# Altium PCB PCB1.PcbDoc
Units mm, origin at the board's own origin, x right, y up, seen from the top; angles counter-clockwise.
Board outline 55.5 x 82.55 mm, 2 copper layers (Top Layer, Bottom Layer); 50 components, 54 nets, 240 pads, 65 vias.
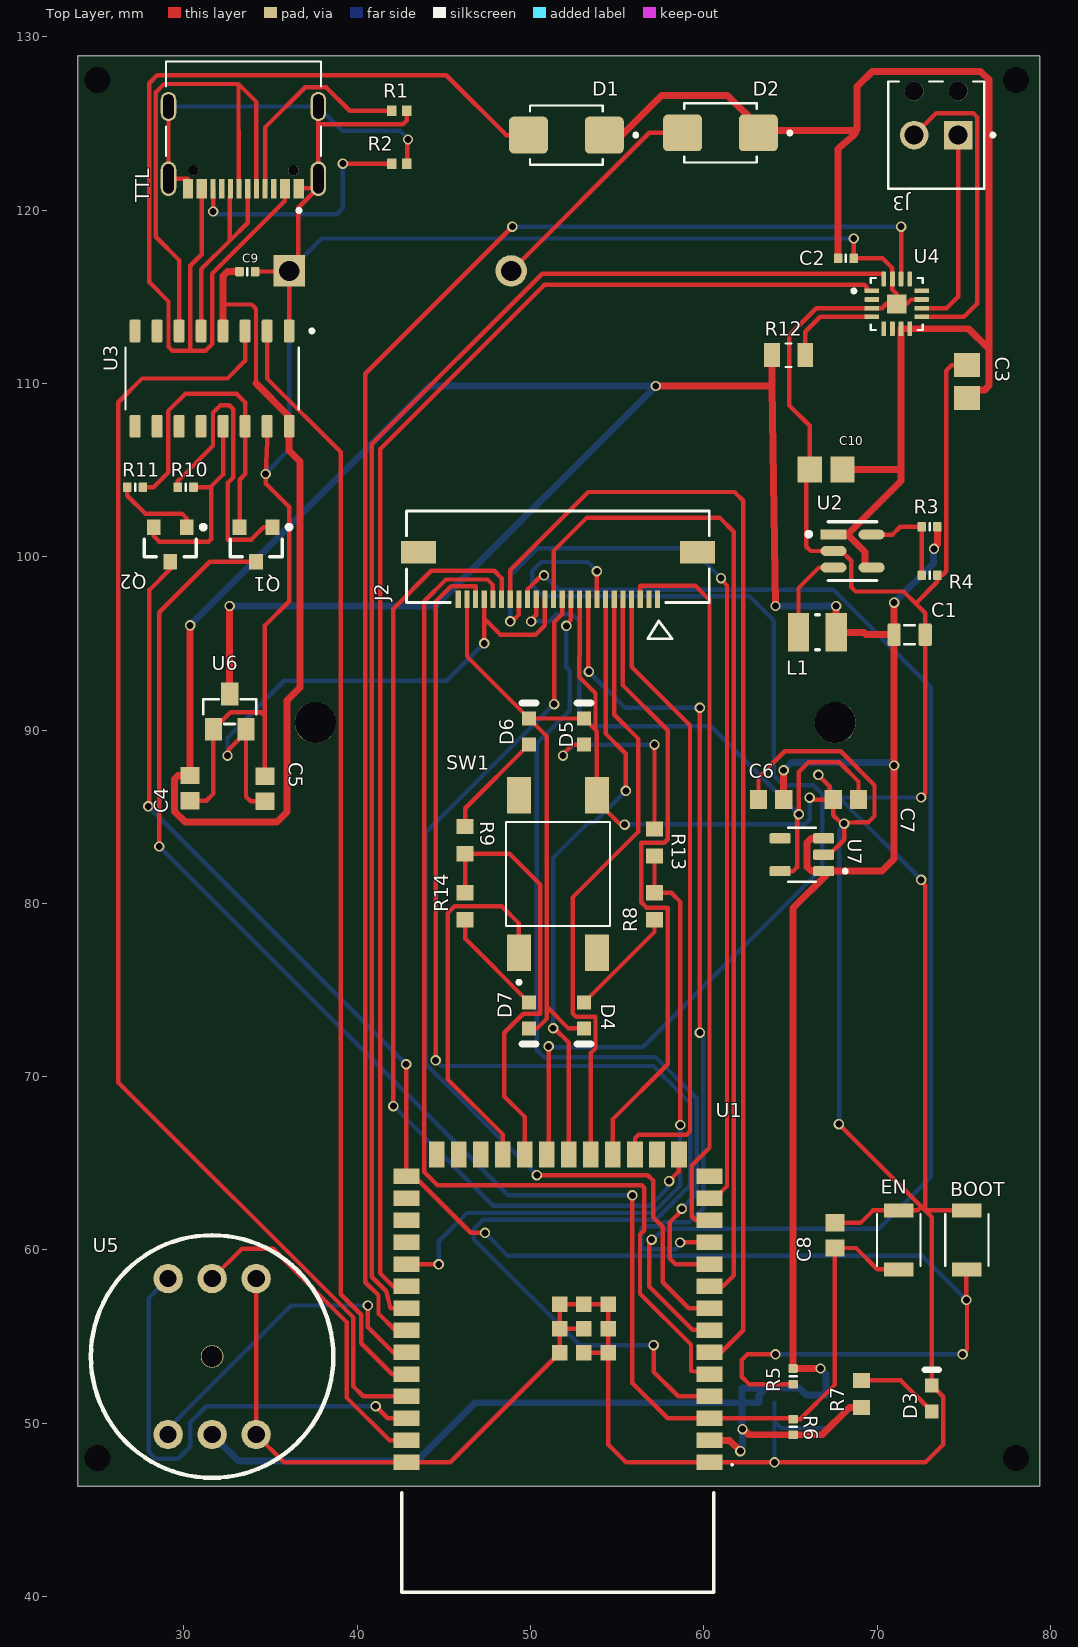
[diagram p0: Top Layer view]
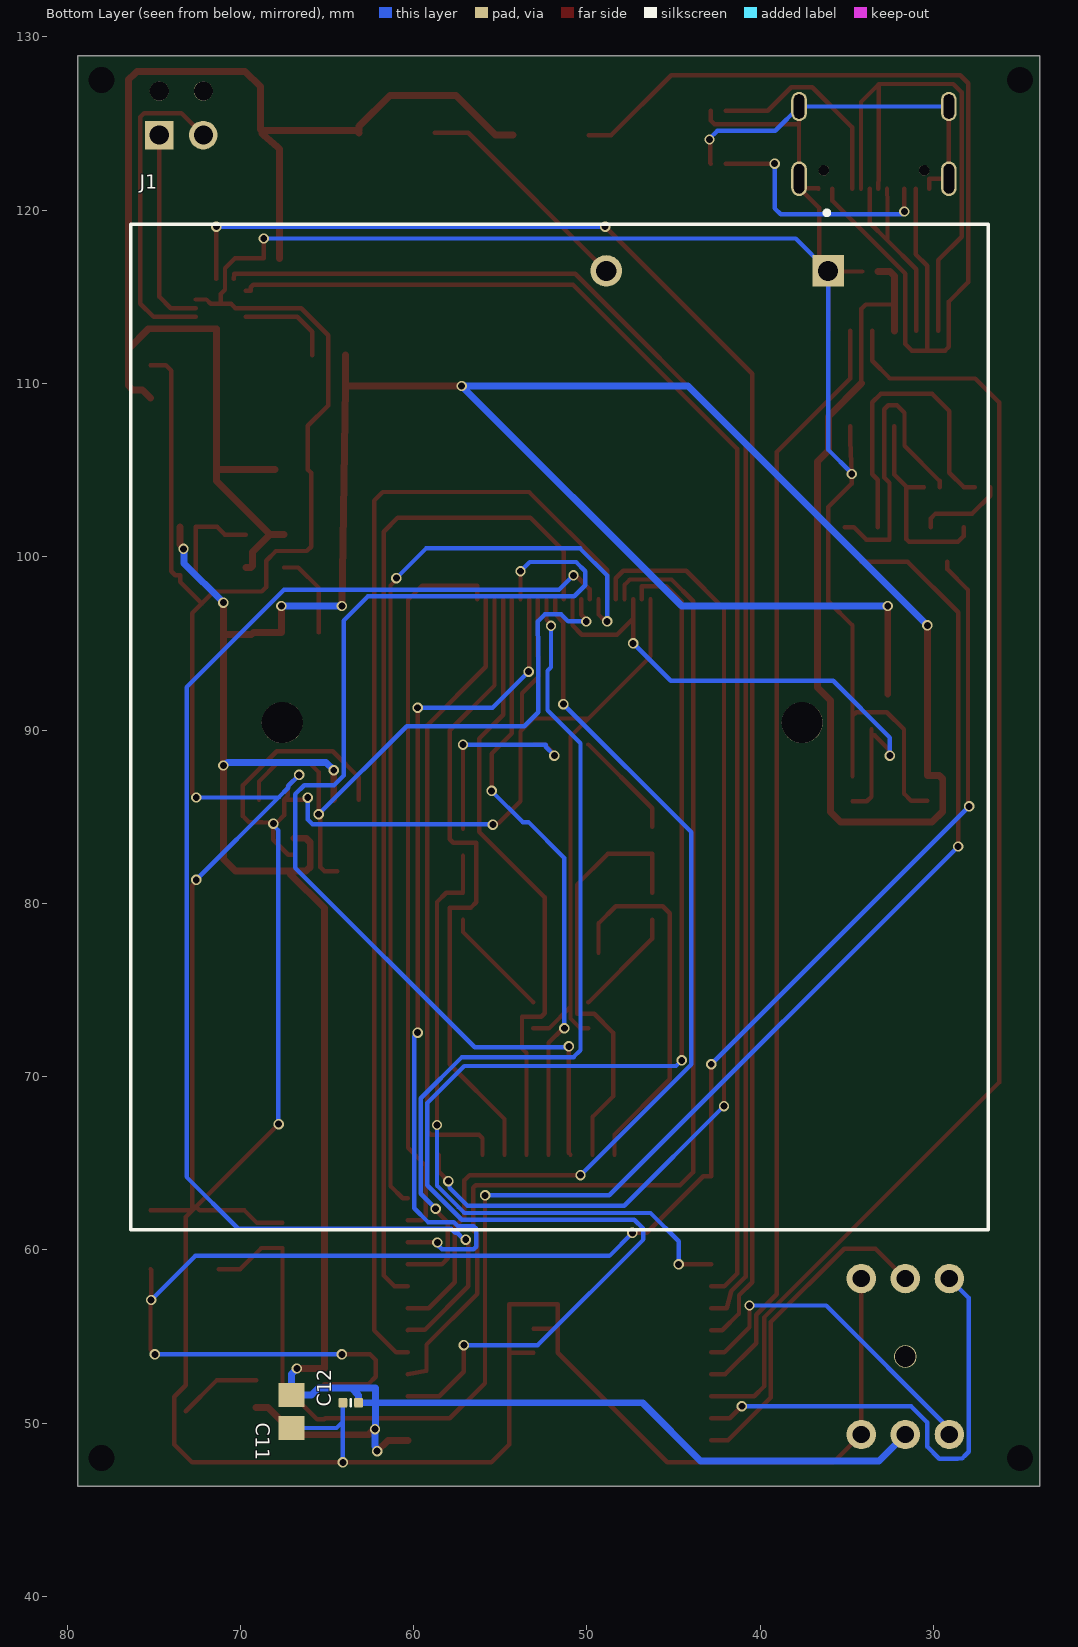
[diagram p1: Bottom Layer view, seen from below]
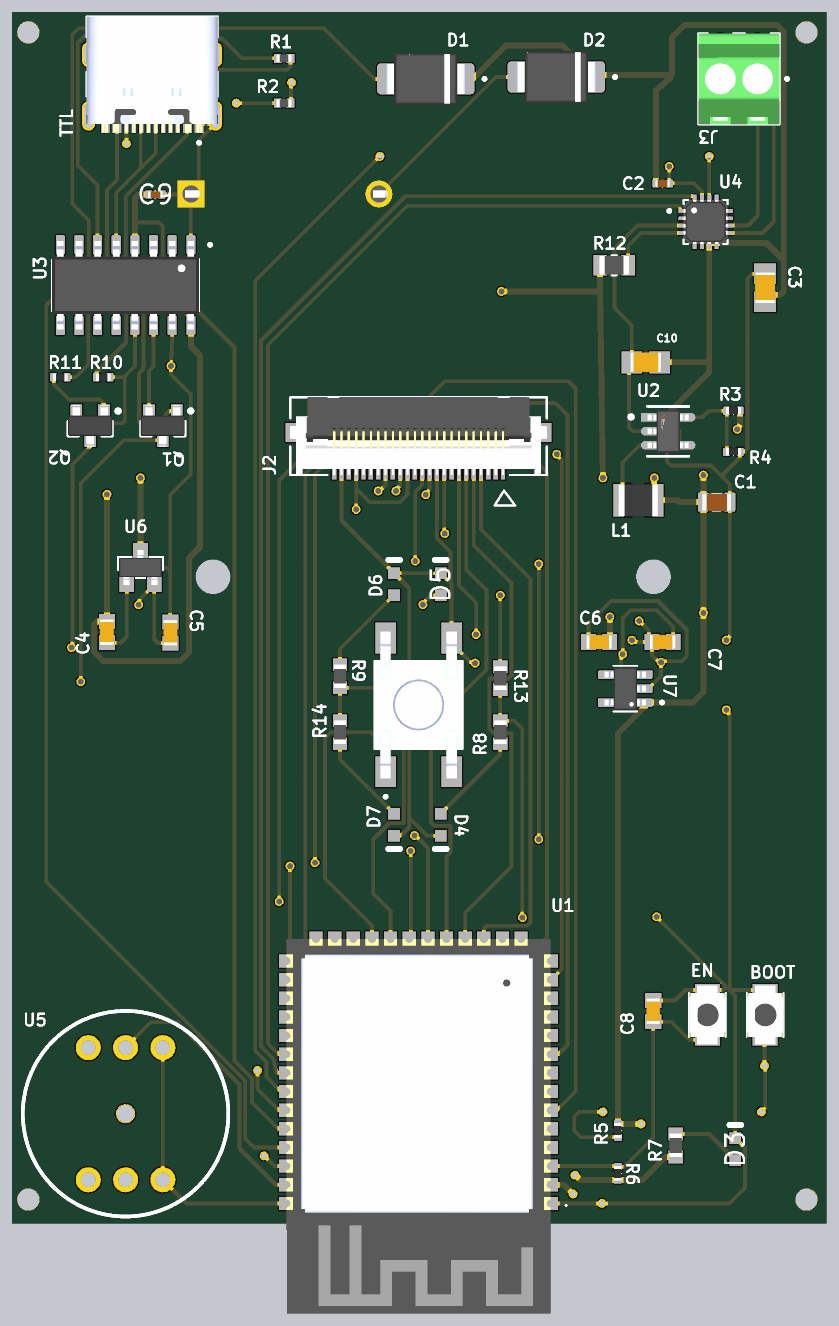
[diagram p2: 3D render of the assembled board from above, using the file's embedded part models]
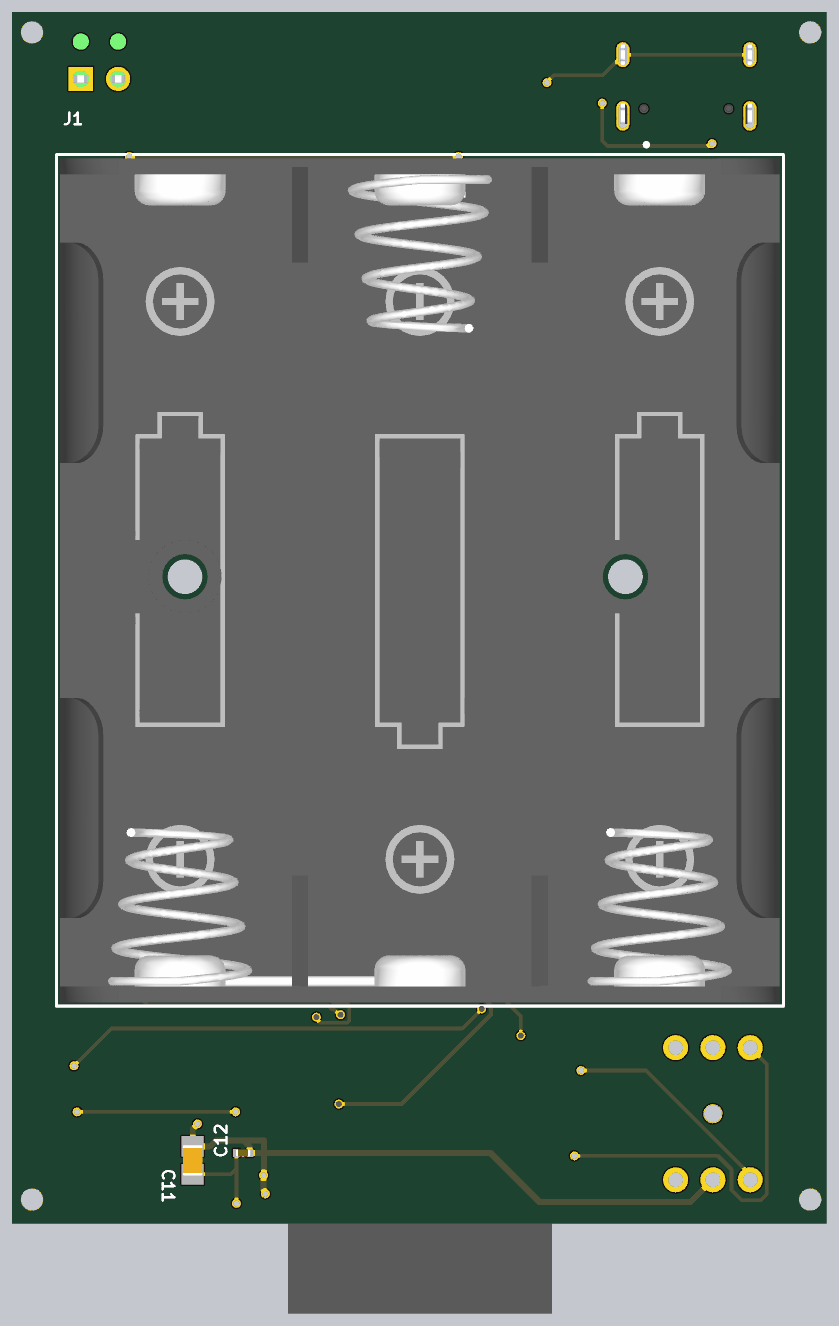
[diagram p3: 3D render of the assembled board from below, using the file's embedded part models]

## Layer stack, top to bottom
Top Solder: solder mask 0.0254, SM-002, Dk 4
Top Layer: signal copper 0.0356
Dielectric 1: dielectric 0.32, FR-4, Dk 4.8
Bottom Layer: signal copper 0.0356
Bottom Solder: solder mask 0.0254, SM-002, Dk 4

## Board outline
23.876,46.355 79.375,46.355 79.375,46.482 79.375,46.736 79.375,128.905 24.13,128.905 23.876,128.905

## Design rules (kind name [scope] priority, off if disabled: settings)
Clearance Clearance_smallQFNs [All] p1: gap=0.127 ignorepadtopadclearanceinfootprint=FALSE
Clearance [All] p2: gap=0.254 ignorepadtopadclearanceinfootprint=FALSE
PolygonConnect [All] p1: connectstyle=Relief reliefconductorwidth=0.254 reliefentries=4 polygonreliefangle="90 Angle" airgapwidth=0.254
RoutingVias [All] p1: holewidth=0.4 width=0.6 viastyle="Through Hole" minholewidth=0.4 minwidth=0.6 maxholewidth=0.711 maxwidth=1.27
SolderMaskExpansion [All] p1: expansion=0.102 istentingtop=FALSE
SupplyNets "Schematic Supply Nets" [InNet('GND')] p1: voltage=0.000
Width Width_1 [InNet('Vcc') or InNet('3V3L')] p1: maxlimit=0.5 minlimit=0.254 preferedwidth=0.4
Width [All] p2: maxlimit=0.254 minlimit=0.254 preferedwidth=0.254
30 further rules are at their usual default settings.

## Components (designator, comment, footprint, x,y, rotation, side; value= is the part's Value field where it differs from the comment)
BOOT "B3U-1000PM" SW_B3U-1000PM 75.184,60.579 r90 top
C1 "Capacitor 22µF +/-40% 16V 0805" CAPC0805(2012)145_L 71.882,95.504 r0 top value=22µF
C2 "Capacitor 100nF +/-20% 50V 0402" CAPC0402(1005)60_L 68.199,117.221 r0 top value=100nF
C3 "Capacitor 10 uF +/- 10% 16 V 0805" CAPC2013X135X45LL10T25 75.184,110.109 r270 top value=10µF
C4 "Capacitor 1uF +/- 10% 16V 0603" CAPC1608X90X35ML15T15 30.353,86.651 r90 top value=1µF
C5 "Capacitor 1uF +/- 10% 16V 0603" CAPC1608X90X35ML15T15 34.671,86.614 r270 top value=1µF
C6 "Capacitor 1uF +/- 10% 16V 0603" CAPC1608X90X35ML15T15 63.881,85.979 r0 top value=1µF
C7 "Capacitor 1uF +/- 10% 16V 0603" CAPC1608X90X35ML15T15 68.199,85.979 r0 top value=1µF
C8 "Capacitor 1uF +/- 10% 16V 0603" CAPC1608X90X35ML15T15 67.564,60.833 r90 top value=1µF
C9 "Capacitor 100nF +/-20% 50V 0402" CAPC0402(1005)60_L 33.655,116.459 r180 top value=100nF
C10 "Capacitor 10 uF +/- 10% 16 V 0805" CAPC2013X135X45LL10T25 67.056,105.029 r180 top value=10µF
C11 "Capacitor 10 uF +/- 10% 16 V 0805" CAPC2013X135X45LL10T25 67.056,50.673 r270 bottom value=10µF
C12 "Capacitor 100nF +/-20% 50V 0402" CAPC0402(1005)60_L 63.627,51.181 r0 bottom value=100nF
D1 "SS24T3G" DIOM5436X247N 52.07,124.333 r180 top
D2 "SS24T3G" DIOM5436X247N 60.96,124.46 r180 top
D3 "LTST-C190KRKT" LTST-C191KRKT_V 73.152,51.435 r90 top
D4 "LTST-C190KRKT" LTST-C191KRKT_V 53.086,73.533 r270 top
D5 "LTST-C190KRKT" LTST-C191KRKT_V 53.086,89.916 r90 top
D6 "LTST-C190GKT" LTST-C190GKT_V 49.911,89.916 r90 top
D7 "LTST-C190GKT" LTST-C190GKT_V 49.911,73.533 r270 top
EN "B3U-1000PM" SW_B3U-1000PM 71.247,60.579 r90 top
J1 "3x AA" FP-BC3AAPC-MFG 51.58,90.174 r90 bottom locked
J2 "5051102491" CON_5051102491_MOL 51.58,100 r180 top
J3 "1725656" PHOENIX_1725656 76.176,127.433 r180 top
L1 "LQM2HPN2R2MG0L" INDC2520X100X60NL20T20 66.548,95.631 r0 top value=2.2µH
Q1 "MMBT3904LT1G" ONSC-SOT-23-3-318-08_V 34.163,100.711 r270 top
Q2 "MMBT3904LT1G" ONSC-SOT-23-3-318-08_V 29.21,100.711 r270 top
R1 "RC0402FR-075K1L" RESC1005X40N 42.418,125.73 r180 top value=5.1k
R2 "RC0402FR-075K1L" RESC1005X40N 42.418,122.682 r0 top value=5.1k
R3 "Resistor 100K +/-1 % 0402 63 mW" RESC0402(1005)_L 73.025,101.727 r0 top value=100k
R4 "Resistor 22K  +/-1 % 0402 63 mW" RESC0402(1005)_L 73.025,98.933 r0 top value=22k
R5 "Resistor 10K  +/-1 % 0402 63 mW" RESC0402(1005)_L 65.151,52.705 r90 top value=10k
R6 "Resistor 10K  +/-1 % 0402 63 mW" RESC0402(1005)_L 65.151,49.784 r270 top value=10k
R7 "CRCW0603120RJNEAHP" RESC1608X55N 69.088,51.689 r90 top value=120
R8 "CRCW0603120RJNEAHP" RESC1608X55N 57.15,79.832 r270 top value=120
R9 "CRCW0603120RJNEAHP" RESC1608X55N 46.228,83.642 r90 top value=120
R10 "Resistor 10K  +/-1 % 0402 63 mW" RESC0402(1005)_L 30.099,104.013 r0 top value=10k
R11 "Resistor 10K  +/-1 % 0402 63 mW" RESC0402(1005)_L 27.178,104.013 r0 top value=10k
R12 "RT0805BRD07634KL" RESC2012X60N 64.897,111.633 r0 top value=634k
R13 "CRCW0603120RJNEAHP" RESC1608X55N 57.15,83.515 r90 top value=120
R14 "CRCW0603120RJNEAHP" RESC1608X55N 46.228,79.832 r270 top value=120
SW1 "TS04-66-50-BK-160-SMT" SW_TS04-66-50-BK-160-SMT 51.58,81.693 r90 top
TTL "TYPE-C-31-M-12" HRO_TYPE-C-31-M-12 33.432,125.981 r180 top
U1 "ESP32-S3-WROOM-1-N16R8" ESP32S3WROOM1N8R2 51.58,53 r180 top
U2 "TLV62569DBVR" FP-DBV0005A-IPC_B 68.58,100.33 r0 top
U3 "CH340C" SOIC127P600X180-16N 31.623,110.28 r270 top
U4 "MAX98357AETE+T" QFN50P300X300X80-17N 71.132,114.592 r0 top
U5 "INMP441" MIC_CIRCULAR_BOARD 31.623,53.848 r0 top
U6 "MCP1700T-2802E/TT" SOT95P237X112-3N 32.639,91.059 r0 top
U7 "LP5907MFX-1.5/NOPB" SOT95P280X145-5N 65.659,82.804 r180 top

## Footprints (in the part's own frame and the unit in brackets; to place one, negate y for a bottom-side part, rotate by r counter-clockwise, add the part's x,y. Pads: shape width x height; smd on the part's side, far side on the other; paste and mask are expansions set on the pad)
CAPC0402(1005)60_L [mm] "Chip Capacitor, Body 1.0x0.5mm, Height 0.6mm, IPC High Density"
  rrect25% 0.5x0.55 smd: 1(-0.45,0) 2(0.45,0)
  silkscreen extent 0,-0.2 0,0.2, body extent -0.5,-0.25 0.5,0.25, height 0.6
CAPC0805(2012)145_L [mm] "Chip Capacitor, Body 2.0x1.2mm, Height 1.45mm, IPC High Density"
  rrect25% 0.76x1.3 smd: 1(-0.9,0) 2(0.89,0)
  silkscreen extent -0.3,-0.55 0.3,0.55, body extent -1,-0.6 1,0.6, height 1.45
CAPC1608X90X35ML15T15 [mm] "Chip Capacitor, 2-Leads, Body 1.75x0.95mm, IPC Low Density"
  rect 1x1.1 smd: 1(-0.725,0) 2(0.725,0)
  body extent -0.87,-0.48 0.87,0.48, height 0.9
CAPC2013X135X45LL10T25 [mm] "Chip Capacitor, 2-Leads, Body 2.10x1.35mm, IPC High Density"
  rect 1.4x1.5 smd: 1(-0.95,0) 2(0.95,0)
  body extent -1.05,-0.67 1.05,0.67, height 1.35
CON_5051102491_MOL [mm] "ZIF Connectors, Horizontal, Bottom Contact, pitch 0.5mm, 24p"
  rect 0.3x1 smd: 1(-5.75,2.45) 2(-5.25,2.45) 3(-4.75,2.45) 4(-4.25,2.45) 5(-3.75,2.45) 6(-3.25,2.45) 7(-2.75,2.45) 8(-2.25,2.45) 9(-1.75,2.45) 10(-1.25,2.45) 11(-0.75,2.45) 12(-0.25,2.45) 13(0.25,2.45) 14(0.75,2.45) 15(1.25,2.45) 16(1.75,2.45) 17(2.25,2.45) 18(2.75,2.45) 19(3.25,2.45) 20(3.75,2.45) 21(4.25,2.45) 22(4.75,2.45) 23(5.25,2.45) 24(5.75,2.45)
  rect 2x1.3 smd: P1(-8.05,-0.25) P2(8.05,-0.25)
  silkscreen extent -8.74,-2.64 8.74,4.72, body extent -8.75,-2.65 8.75,2.65, height 2.09
DIOM5436X247N [mm]
  rrect25% 2.25x2.12 smd paste+0 mask+0.102: A(2.185,0) C(-2.185,0)
  silkscreen extent -4.1,-1.72 2.09,1.72, body extent -2.72,-1.78 2.72,1.78, height 2.44
ESP32S3WROOM1N8R2 [mm]
  rect 1.5x0.9 smd: 1(-8.75,5.26) 2(-8.75,3.99) 3(-8.75,2.72) 4(-8.75,1.45) 5(-8.75,0.18) 6(-8.75,-1.09) 7(-8.75,-2.36) 8(-8.75,-3.63) 9(-8.75,-4.9) 10(-8.75,-6.17) 11(-8.75,-7.44) 12(-8.75,-8.71) 13(-8.75,-9.98) 14(-8.75,-11.25) 27(8.75,-11.25) 28(8.75,-9.98) 29(8.75,-8.71) 30(8.75,-7.44) 31(8.75,-6.17) 32(8.75,-4.9) 33(8.75,-3.63) 34(8.75,-2.36) 35(8.75,-1.09) 36(8.75,0.18) 37(8.75,1.45) 38(8.75,2.72) 39(8.75,3.99) 40(8.75,5.26)
  rect 0.9x1.5 smd: 15(-6.985,-12.5) 16(-5.715,-12.5) 17(-4.445,-12.5) 18(-3.175,-12.5) 19(-1.905,-12.5) 20(-0.635,-12.5) 21(0.635,-12.5) 22(1.905,-12.5) 23(3.175,-12.5) 24(4.445,-12.5) 25(5.715,-12.5) 26(6.985,-12.5)
  rect 0.9x0.9 smd: 41(-1.5,-2.46) 42(-1.5,-1.06) 43(-2.9,-1.06) 44(-2.9,-2.46) 45(-2.9,-3.86) 46(-1.5,-3.86) 47(-0.1,-3.86) 48(-0.1,-2.46) 49(-0.1,-1.06)
  silkscreen extent -10.1,5.35 9,12.75, body extent -9,-12.75 9,12.75, height 3.25
FP-BC3AAPC-MFG [mm]
  rect 1.82x1.82 hole 1.17 paste-2539.97 mask+0: 1(26.32,-15.5)
  round 1.82 hole 1.17 paste-2539.97 mask+0: 2(26.32,-2.7)
  round 2.37 hole 2.37 unplated paste-2539.97 mask+0: MH1(0.25,16) MH2(0.25,-14)
  silkscreen extent -29,-24.75 29.8,24.75, body extent -28.75,-24.5 28.75,24.5, height 17
FP-DBV0005A-IPC_B [mm]
  rect 1.505x0.572 smd paste+0 mask+0: 1(-1.1,0.95)
  rrect100% 1.505x0.572 smd paste+0 mask+0: 2(-1.1,0) 3(-1.1,-0.95) 4(1.1,-0.95) 5(1.1,0.95)
  silkscreen extent -2.65,-1.7 1.4,1.7, body extent -2.1,-1.7 2.1,1.7, height 0.25
HRO_TYPE-C-31-M-12 [mm]
  rect 0.6x1.14 smd mask+0.05: A1_B12(-3.2,4.75) A4_B9(-2.4,4.75) B1_A12(3.2,4.75) B4_A9(2.4,4.75)
  rect 0.3x1.14 smd mask+0.05: A5(-1.25,4.75) A6(-0.25,4.75) A7(0.25,4.75) A8(1.25,4.75) B5(1.75,4.75) B6(0.75,4.75) B7(-0.75,4.75) B8(-1.75,4.75)
  oval 0.9x2 hole 0.6 slot 1.7 at 90 deg: S1(-4.325,4.17) S2(4.325,4.17)
  oval 0.9x1.7 hole 0.6 slot 1.4 at 90 deg: S3(-4.325,0) S4(4.325,0)
  round 0.6 hole 0.6 unplated: ""(-2.89,3.68) ""(2.89,3.68)
  silkscreen extent -4.47,-2.6 4.47,6.1, body extent -4.47,-2.6 4.47,5.31, height 3.31
INDC2520X100X60NL20T20 [mm] "Chip Inductor, 2-Leads, Body 2.7x2.2mm, IPC Medium Density"
  rect 1.23x2.22 smd: 1(-1.085,0) 2(1.085,0)
  silkscreen extent -0.1,-1.01 0.1,1.01, body extent -1.35,-1.1 1.35,1.1, height 1
LTST-C190GKT_V [mm] "SMD, 2-Leads, Body 1.6x0.8mm"
  rect 0.8x0.8 smd: 1(-0.75,0) 2(0.75,0)
  silkscreen extent 1.65,-0.4 1.65,0.4, body extent -0.8,-0.4 0.8,0.4, height 0.9
LTST-C191KRKT_V [mm] "SMD, 2-Leads, Body 1.6x0.8mm"
  rect 0.8x0.8 smd: 1(-0.75,0) 2(0.75,0)
  silkscreen extent 1.65,-0.4 1.65,0.4, body extent -0.8,-0.4 0.8,0.4, height 0.9
MIC_CIRCULAR_BOARD [mm] "COMMON CIRCULAR INMP441 MODULE"
  round 1.3 hole 1.2 unplated: 0(0,0)
  round 1.7 hole 1: 1(-2.54,4.5) 2(-2.54,-4.5) 3(0,4.5) 4(2.54,4.5) 6(2.54,-4.5) 7(0,-4.5)
  silkscreen extent -7,-7 7,7
ONSC-SOT-23-3-318-08_V [mm] "SOT23, 3-Leads, Body 3.04x1.4mm, Pitch 0.95mm"
  rect 0.9x0.8 smd: 1(-1,0.95) 2(-1,-0.95) 3(1,0)
  silkscreen extent -1.12,-1.5 0.7,2.03, body extent -1.42,-1.52 1.42,1.52, height 1.11
PHOENIX_1725656 [mm]
  rect 1.65x1.65 / inner round 1.65 / far side rect 1.65x1.65 hole 1.1: 1(1.5,3.1)
  round 1.65 hole 1.1: 2(4.04,3.1)
  round 1.1 hole 1.1 unplated: ""(1.5,0.56) ""(4.04,0.56)
  silkscreen extent -0.6,0 5.54,6.2, body extent 0,0 5.54,6.2, height 8.65
QFN50P300X300X80-17N [mm]
  rrect25% 0.84x0.27 smd: 1(-1.435,0.75) 2(-1.435,0.25) 3(-1.435,-0.25) 4(-1.435,-0.75) 9(1.435,-0.75) 10(1.435,-0.25) 11(1.435,0.25) 12(1.435,0.75)
  rrect25% 0.27x0.84 smd: 5(-0.75,-1.435) 6(-0.25,-1.435) 7(0.25,-1.435) 8(0.75,-1.435) 13(0.75,1.435) 14(0.25,1.435) 15(-0.25,1.435) 16(-0.75,1.435)
  rect 1.1x1.1 smd paste-0.2: 17(0,0)
  silkscreen extent -2.57,-1.5 1.5,1.5, body extent -1.5,-1.5 1.5,1.5, height 0.9
RESC0402(1005)_L [mm] "Chip Resistor, Body 1.0x0.5mm, IPC High Density"
  rrect25% 0.5x0.55 smd: 1(-0.45,0) 2(0.45,0)
  silkscreen extent 0,-0.2 0,0.2, body extent -0.5,-0.25 0.5,0.25, height 0.3
RESC1005X40N [mm]
  rect 0.54x0.6 smd: 1(-0.432,0) 2(0.432,0)
  body extent -0.5,-0.25 0.5,0.25, height 0.4
RESC1608X55N [mm] "Chip Resistor, Body 1.6x0.8mm, IPC High Density"
  rect 0.87x0.98 smd paste+0 mask+0.102: 1(-0.78,0) 2(0.78,0)
  body extent -0.8,-0.43 0.8,0.43, height 0.55
RESC2012X60N [mm]
  rect 0.92x1.38 smd: 1(-0.955,0) 2(0.955,0)
  silkscreen extent -0.17,-0.68 0.17,0.68, body extent -1,-0.63 1,0.63, height 0.6
SOIC127P600X180-16N [mm]
  rrect25% 1.31x0.62 smd: 1(-2.75,4.445) 2(-2.75,3.175) 3(-2.75,1.905) 4(-2.75,0.635) 5(-2.75,-0.635) 6(-2.75,-1.905) 7(-2.75,-3.175) 8(-2.75,-4.445) 9(2.75,-4.445) 10(2.75,-3.175) 11(2.75,-1.905) 12(2.75,-0.635) 13(2.75,0.635) 14(2.75,1.905) 15(2.75,3.175) 16(2.75,4.445)
  silkscreen extent -2.85,-5 1.77,5.85, body extent -3,-5 3,5, height 1.8
SOT95P237X112-3N [mil]
  rect 39x52 smd: 1(-37,-40) 2(37,-40) 3(0,40)
  silkscreen extent -60,-28 60,28, body extent -57,-47 57,47, height 44
SOT95P280X145-5N [mm]
  rrect25% 1.21x0.58 smd paste+0 mask+0.102: 1(-1.255,0.95) 2(-1.255,0) 3(-1.255,-0.95) 4(1.255,-0.95) 5(1.255,0.95)
  silkscreen extent -2.6,-1.56 0.8,1.56, body extent -1.4,-1.45 1.4,1.45, height 1.45
SW_B3U-1000PM [mm]
  rect 0.8x1.7 smd paste+0 mask+0.102: 1(-1.7,0) 2(1.7,0)
  silkscreen extent -1.5,-1.25 1.5,1.25, body extent -2,-1.25 2,1.25, height 1.75
SW_TS04-66-50-BK-160-SMT [mm] "SMD Tact Switch, body 6x6mm"
  rect 2.1x1.4 smd: 1(-4.55,2.25) 2(-4.55,-2.25) 3(4.55,2.25) 4(4.55,-2.25)
  silkscreen extent -6.35,-3 3,3, body extent -5,-3 5,3, height 5

## Part data
BOOT EN: library part CMP-021-000000-2, "Top, w/o Boss 1k Reel", Package="Custom Package Omron", Check_prices=https://www.snapeda.com/parts/B3U-1000PM/Omron/view-part/?ref=eda, Component Type=Standard, Design Item ID=B3U-1000PM, MF=Omron, MP=B3U-1000PM, Pin Count=2, SnapEDA_Link=https://www.snapeda.com/parts/B3U-1000PM/Omron/view-part/?ref=snap, Source=B3U-1000PM.SchLib
C1: library part CMP-001-00081-4, "Chip Capacitor, 22µF +/-40%, 16V, 0805, Thickness 1.45 mm", Case/Package=0805, Max Operating Temperature=85°C, Min Operating Temperature=-55°C, Tolerance=5%, Voltage Rating=16V, Mounting Technology=SMT, Pins=2
C2 C9 C12: library part CMP-001-00067-3, "Chip Capacitor, 100nF +/-20%, 50V, 0402, Thickness 0.6 mm", Case/Package=0402, Max Operating Temperature=85°C, Min Operating Temperature=-55°C, Tolerance=10%, Voltage Rating=50V, Mounting Technology=SMT, Pins=2
C3 C10 C11: library part CMP-001-00015-6, "Chip Capacitor, 10 uF, +/- 10%, 16 V, 0805 (2012 Metric)", Capacitor Type=Ceramic, Case/Package=0805, Max Operating Temperature=85°C, Min Operating Temperature=-55°C, Tolerance=10%, Voltage Rating=16V, Mounting Technology=SM, Pins=2, RoHS Compliant=True
C4 C5 C6 C7 C8: library part CMP-001-00004-6, "Chip Capacitor, 1 uF, +/- 10%, 16 V, 0603 (1608 Metric)", Capacitor Type=Ceramic, Case/Package=0603, Max Operating Temperature=125°C, Min Operating Temperature=-55°C, Tolerance=10%, Voltage Rating=16V, Mounting Technology=SM, Pins=2, RoHS Compliant=True
D1 D2: library part CMP-004-00032-2, "Diode Schottky 40 V 2A Surface Mount SMB", Case/Package="SMB-2 ON Semiconductor", Check_prices=https://www.snapeda.com/parts/SS24T3G/Onsemi/view-part/?ref=eda, Component Type=Standard, Design Item ID=SS24T3G, MF=onsemi, MP=SS24T3G, Pins=2, SnapEDA_Link=https://www.snapeda.com/parts/SS24T3G/Onsemi/view-part/?ref=snap, Source=SS24T3G.SchLib
D3 D4 D5: library part CMP-007-00024-2, "LED Uni-Color Red, 62.5 mW, 25 mA, -30 to 85 degC, 2-Pin SMD, RoHS, Tape and Reel", Case/Package=0603, Colour=Red, Forward Current=20mA, Forward Voltage=2V, Manufacturer=Lite-On, Max Operating Temperature=85°C, Min Operating Temperature=-55°C, Package Description="2-Pin Surface Mount Device, Body 1.6 x 0.8 mm", Package Quantity=3000, Package Reference=C191KRKT, Power=75mW, Datasheet URL=http://optoelectronics.liteon.com/upload/download/DS-22-99-0151/S_110_LTST-C190KRKT.pdf, Datasheet Version="Rev. F, 05/2013", Illumination Colour=Red, Lens Style=Diffused, Luminous Intensity=54mcd, Manufacturer URL=http://www.us.liteon.com/, Mounting Technology=SM, Nominal Vf=2V, Packaging=TapeandReel, Pins=2, RoHS Compliant=True, Viewing Angle=130degrees
D6 D7: library part CMP-007-00022-2, "LED Uni-Color Green, 100 mW, 30 mA, -55 to 85 degC, 2-Pin SMD, RoHS, Tape and Reel", Case/Package=0603, Colour=Green, Forward Current=20mA, Forward Voltage=2.1V, Manufacturer=Lite-On, Max Operating Temperature=85°C, Min Operating Temperature=-55°C, Package Description="2-Pin Surface Mount Device, Body 1.6 x 0.8 mm", Package Quantity=3000, Package Reference=C190GKT, Power=100mW, Datasheet URL=http://datasheet.octopart.com/LTST-C190GKT-Lite-On-datasheet-158530.pdf, Datasheet Version=Dec-06, Illumination Colour=Green, Lens Style=Clear, Luminous Intensity=6mcd, Manufacturer URL=http://www.us.liteon.com/, Mounting Technology=SM, Nominal Vf=2.1V, Packaging=TapeandReel, Pins=2, RoHS Compliant=True, Viewing Angle=130degrees
J1: library part CMP-00029-00001-1, "Battery Holder 3 Cells AA Size Polypropylene", Max Operating Temperature=100°C, Min Operating Temperature=-10°C, Height=17mm, Mounting Technology="PCB, Through Hole", Number of Cells=3, RoHS=Compliant, Termination="PC Pin"
J2: library part CMP-002-00081-2, "24 Position FFC, FPC Connector Contacts, Bottom 0.020 (0.50mm) Surface Mount, Right Angle", Case/Package=None, Check_prices=https://www.snapeda.com/parts/5051102491/Molex/view-part/?ref=eda, Component Type=Standard, Design Item ID=5051102491, MF=Molex, MP=5051102491, Pins=26, SnapEDA_Link=https://www.snapeda.com/parts/5051102491/Molex/view-part/?ref=snap, Source=5051102491.SchLib
J3: library part CMP-035-000001-1, "PCB Terminal Screw 2.54mm 20AWG 160V 6A 2 Position COMBICON MPT Series", Package=None, Check_prices=https://www.snapeda.com/parts/1725656/Phoenix+Contact/view-part/?ref=eda, Component Type=Standard, Design Item ID=1725656, MF="Phoenix Contact", MP=1725656, Pin Count=2, SnapEDA_Link=https://www.snapeda.com/parts/1725656/Phoenix+Contact/view-part/?ref=snap, Source=1725656.SchLib
L1: library part CMP-006-00009-6, "Chip Inductor, 2.2 uH, +/- 20%, -55 to 125 degC, 1008 (2520 Metric), RoHS, Tape and Reel", Case/Package=1008, Current Rating=1.3A, Manufacturer=Murata, Max Operating Temperature=125°C, Min Operating Temperature=-55°C, Package Description="2-Pin Surface Mounted Device, Body 2.5 x 2 mm", Package Quantity=3000, Self Resonant Frequency=40MHz, Tolerance=20%, Core Material=Ferrite, Datasheet URL=http://psearch.en.murata.com/inductor/product/LQM2HPN2R2MG0%23.pdf, Datasheet Version=Aug-16, Mounting Technology=SM, Package Reference=1008, Packaging=TapeandReel, RoHS Compliant=True, Shielding=Shielded
Q1 Q2: library part CMP-013-00007-3, "General Purpose Transistor, NPN Silicon, 40 V, 0.2 A, -55 to 150 degC, 3-Pin SOT23, RoHS, Tape and Reel", Case/Package=TO-236-3, Frequency=300MHz, Manufacturer="ON Semiconductor", Max Operating Temperature=150°C, Min Operating Temperature=-55°C, Package Description="3-Pin Small Outline Transistor, Body 2.9 x 1.3 mm, Pitch 0.95 mm", Package Quantity=3000, Package Reference="SOT-23 (318-08)", Power=225mW, Datasheet URL=http://www.onsemi.cn/pub_link/Collateral/MMBT3904LT1-D.PDF, Datasheet Version="Rev. 12, 11/2012", Elements=1, hFE Min=80, Mounting Technology=SM, Packaging=TapeandReel, Pins=3, RoHS Compliant=True, Vce Max=300mV
R1 R2: library part CMP-009-00178-1, "5.1 kOhms Â±1% 0.063W, 1/16W Chip Resistor 0402 (1005 Metric) Moisture Resistant Thick Film", Case/Package="1005 Panasonic Electronic Components", Check_prices=https://www.snapeda.com/parts/RC0402FR-075K1L/Yageo/view-part/?ref=eda, Component Type=Standard, Design Item ID=RC0402FR-075K1L, MF=Yageo, MP=RC0402FR-075K1L, Pins=2, SnapEDA_Link=https://www.snapeda.com/parts/RC0402FR-075K1L/Yageo/view-part/?ref=snap, Source=RC0402FR-075K1L.SchLib
R3: library part CMP-009-00168-3, "Chip Resistor, 100 kOhms, +/-1 %, 63 mW, -55 to 155 degC, 0402", Case/Package=0402, Max Operating Temperature=155°C, Min Operating Temperature=-55°C, Power=63mW, Tolerance=1%, Pins=2
R4: library part CMP-009-00123-3, "Chip Resistor, 22 kOhms, +/-1 %, 63 mW, -55 to 155 degC, 0402", Case/Package=0402, Max Operating Temperature=155°C, Min Operating Temperature=-55°C, Power=63mW, Tolerance=1%, Pins=2
R5 R6 R10 R11: library part CMP-009-00149-3, "Chip Resistor, 10 kOhms, +/-1 %, 63 mW, -55 to 125 degC, 0402", Case/Package=0402, Max Operating Temperature=155°C, Min Operating Temperature=-55°C, Power=63mW, Tolerance=1%, Pins=2
R7 R8 R9 R13 R14: library part CMP-009-00185-1, "120 Ohms Â±5% 0.333W, 1/3W Chip Resistor 0603 (1608 Metric) Automotive AEC-Q200, Pulse Withstanding Thick Film", Case/Package="1608 Vishay", Check_prices=https://www.snapeda.com/parts/CRCW0603120RJNEAHP/Vishay+Dale/view-part/?ref=eda, Component Type=Standard, Design Item ID=CRCW0603120RJNEAHP, MF="Vishay Dale", MP=CRCW0603120RJNEAHP, Pins=2, SnapEDA_Link=https://www.snapeda.com/parts/CRCW0603120RJNEAHP/Vishay+Dale/view-part/?ref=snap, Source=CRCW0603120RJNEAHP.SchLib
R12: library part CMP-009-00181-1, "634 kOhms Â±0.1% 0.125W, 1/8W Chip Resistor 0805 (2012 Metric) Thin Film", Case/Package="2012 Yageo", Check_prices=https://www.snapeda.com/parts/RT0805BRD07634KL/Yageo/view-part/?ref=eda, Component Type=Standard, Design Item ID=RT0805BRD07634KL, MF=Yageo, MP=RT0805BRD07634KL, Pins=2, SnapEDA_Link=https://www.snapeda.com/parts/RT0805BRD07634KL/Yageo/view-part/?ref=snap, Source=RT0805BRD07634KL.SchLib
SW1: library part CMP-011-00013-1, "6 x 6 mm, 5 mm Actuator Height, 160 gf, Black, Surface Mount, SPST, Tactile Switch", Case/Package=None, Check_prices=https://www.snapeda.com/parts/TS04-66-50-BK-160-SMT/Same+Sky/view-part/?ref=eda, Component Type=Standard, Design Item ID=TS04-66-50-BK-160-SMT, MF="Same Sky", MP=TS04-66-50-BK-160-SMT, Pins=4, SnapEDA_Link=https://www.snapeda.com/parts/TS04-66-50-BK-160-SMT/Same+Sky/view-part/?ref=snap, Source=TS04-66-50-BK-160-SMT.SchLib
TTL: library part CMP-051-000000-1, "USB Connectors 24 Receptacle 1 8.94*7.3mm RoHS", Package=Package, Check_prices=https://www.snapeda.com/parts/TYPE-C-31-M-12/HRO+Electronics+Co.%252C+Ltd./view-part/?ref=eda, Component Type=Standard, Design Item ID=TYPE-C-31-M-12, MF="HRO Electronics Co., Ltd.", MP=TYPE-C-31-M-12, Pin Count=16, SnapEDA_Link=https://www.snapeda.com/parts/TYPE-C-31-M-12/HRO+Electronics+Co.%252C+Ltd./view-part/?ref=snap, Source=TYPE-C-31-M-12.SchLib
U1: "Bluetooth, WiFi 802.11b/g/n, Bluetooth v5.0 Transceiver Module 2.4GHz PCB Trace Surface Mount", Package="NON STANDARD Espressif Systems", Check_prices=https://www.snapeda.com/parts/ESP32-S3-WROOM-1-N16R8/Espressif+Systems/view-part/?ref=eda, MF="Espressif Systems", MP=ESP32-S3-WROOM-1-N16R8, SnapEDA_Link=https://www.snapeda.com/parts/ESP32-S3-WROOM-1-N16R8/Espressif+Systems/view-part/?ref=snap
U2: library part CMP-031-00006-1, "IC REG BUCK ADJ 2A SOT23-5 \"Buck Switching Regulator IC Positive Adjustable 0.6V Output 2A SC-74A, SOT-753\"", Case/Package=SOT-23, Manufacturer Lifecycle Status=ACTIVE, Max Junction Temperature (Tj)=125°C, Max Supply Voltage=5.5V, Min Operating Temperature=-40°C, Min Supply Voltage=2.5V, Nominal Supply Current=35µA, Output Current=2A, Switching Frequency=1.5MHz, Height=1.45mm, Length=2.9mm, Lifecycle Status=Production, Max Duty Cycle=100%, Max Operating Temperature=125°C, Number of Outputs=1, Output Voltage=5.5V, Packaging="Cut Tape", Pins=5, RoHS=Compliant, Schedule B="8542390000, 8542390000", Thickness=1.2mm, Topology=Buck, Width=1.6mm
U3: library part CMP-011-000000-1, "USB to serial chip CH340", Package=None, Availability="Not in stock", Check_prices=https://www.snapeda.com/parts/CH340C/WCH/view-part/?ref=eda, Component Type=Standard, Design Item ID=CH340C, MF=WCH, MP=CH340C, Pin Count=16, Price=None, SnapEDA_Link=https://www.snapeda.com/parts/CH340C/WCH/view-part/?ref=snap, Source=CH340C.SchLib
U4: library part CMP-014-00002-1, "Tiny, Low-Cost, PCM Class D Amplifier with Class AB Performance", Case/Package="TQFN-16 Maxim", Check_prices=https://www.snapeda.com/parts/MAX98357AETE+T/Analog+Devices/view-part/?ref=eda, Component Type=Standard, Design Item ID=MAX98357AETE+T, MF="Analog Devices", MP=MAX98357AETE+T, Pins=13, SnapEDA_Link=https://www.snapeda.com/parts/MAX98357AETE+T/Analog+Devices/view-part/?ref=snap, Source=MAX98357AETE+T.SchLib
U6: library part CMP-029-000000-1, "250mA CMOS LDO, Isupply 1uA and 2% Vout Accuracy3 SOT-23 T/R", Package="SOT-23 Microchip", Check_prices=https://www.snapeda.com/parts/MCP1700T-2802E/TT/Microchip/view-part/?ref=eda, Component Type=Standard, Design Item ID=MCP1700T-2802E/TT, MF=Microchip, MP=MCP1700T-2802E/TT, Pin Count=3, SnapEDA_Link=https://www.snapeda.com/parts/MCP1700T-2802E/TT/Microchip/view-part/?ref=snap, Source=MCP1700T-2802E_TT.SchLib
U7: library part CMP-059-000001-3, "250-mA, low-noise, high-PSRR, ultra-low-dropout voltage regulator with low IQ and enable, 1.5V fixed output", Package=None, Availability=Unavailable, Component Type=Standard, Design Item ID=LP5907MFX-1.5/NOPB, MF="{'manufacturer': u'Texas Instruments'}", MP=LP5907MFX-1.5/NOPB, Pin Count=5, Price=None, Source=LP5907MFX-1.5_NOPB.SchLib

## Free pads (board coordinates)
  round 0 hole 1.5: 5(25,48) 5(25,127.5) 5(78,48) 5(78,127.5)

## Via types
v1: diameter 0.6, hole 0.4, Top Layer to Bottom Layer, 65 vias

## Nets (pads, with @x,y where several pads share a name; then routed paths per layer and width w, separated by ;. In a path a pad name is that pad's centre, name@x,y a point inside that pad or via, vN(x,y) a via of type N, cw(c..) or ccw(c..) an arc to the next point about the centre after c; other vN are vias at no path point)
1V5: C7.2 J2.15 U7.5 | length 36.7
  Top Layer w0.254: v1(50.038,96.266) 50.038,96.36 50.33,96.652 J2.15 ; U7.5 65.141,81.854 65.38,82.093 65.38,85.141 v1(65.481,85.141) 65.481,87.579 66.04,88.138 67.818,88.138 68.924,87.032 C7.2
  Bottom Layer w0.254: v1(50.038,96.266) 51.075,96.266 51.482,96.672 52.426,96.672 52.832,96.266 52.807,94.564 52.807,91.034 53.619,90.221 60.401,90.221 v1(65.481,85.141)
2V8: C5.2 J2.14 J2.21 U6.2 | length 33.1
  Top Layer w0.254: v1(32.512,88.519) 32.578,88.585 32.578,88.877 33.388,89.687 U6.2@33.579,89.687 ; U6.2 U6.2@33.579,89.687 ; C5.2 33.847,85.889 33.579,86.157 U6.2@33.579,89.687 ; v1(47.33,95.006) 47.33,96.434 ; J2.21 47.33,96.434 ; J2.14 50.83,96.042 50.292,95.504 48.26,95.504 47.33,96.434
  Bottom Layer w0.254: v1(32.512,88.519) 32.512,89.56 35.789,92.837 45.161,92.837 v1(47.33,95.006)
3V3L: C1.1 C4.2 C6.2 C9.2 C11.1 C12.1 L1.2 R3.2 R5.2 R6.2 R7.1 R12.1 U1.2 U3.4 U3.16 U5.7 U6.3 U7.1 U7.3 | length 274.5
  Top Layer w0.254: 32.258,114.617 32.322,114.554 33.909,114.554 34.159,114.304 34.159,110.011
  Top Layer w0.4: v1(30.353,96.037) C4.2 29.667,87.376 29.464,87.173 29.464,85.299 30.074,84.689 35.357,84.689 35.941,85.274 35.941,91.694 36.703,92.456 36.703,105.486 36.068,106.121 U3.16 36.068,108.102 34.159,110.011 ; U3.4 32.258,114.554 32.322,114.554 ; 32.258,114.617 32.258,116.205 32.512,116.459 C9.2 ; U6.3 v1(32.639,97.155) ; v1(57.226,109.855) 63.942,109.855 ; U1.2 61.48,49.01 v1(62.103,48.387) ; v1(62.23,49.657) 62.284,49.657 62.607,49.334 R6.2 66.827,49.334 68.402,50.909 R7.1 ; R12.1 63.942,109.855 ; v1(64.135,97.155) 63.942,109.855 ; C6.2 v1(64.606,87.681) ; v1(66.733,53.155) R5.2 65.151,79.732 67.094,81.674 U7.1 ; U7.3 66.203,83.754 65.964,83.515 65.964,82.093 66.203,81.854 U7.1 ; v1(67.633,97.155) L1.2 69.24,95.631 69.367,95.504 C1.1 ; v1(70.982,97.347) C1.1 ; v1(73.279,100.457) 73.279,100.511 73.475,100.707 R3.2 ; U7.1 70.282,81.854 70.982,82.554 v1(70.982,87.952) C1.1
  Bottom Layer w0.4: v1(30.353,96.037) 44.171,109.855 v1(57.226,109.855) 44.526,97.155 v1(32.639,97.155) ; U5.7 33.143,47.828 43.434,47.828 46.787,51.181 62.192,51.181 ; v1(62.103,48.387) 62.141,48.425 62.141,48.556 62.23,48.645 v1(62.23,49.657) 62.192,49.695 62.192,51.181 ; v1(64.135,97.155) v1(67.633,97.155) ; v1(64.606,87.681) 65.063,88.138 70.742,88.138 70.928,87.952 v1(70.982,87.952) ; v1(66.733,53.155) 67.056,52.832 C11.1 65.888,51.623 65.491,52.019 63.583,52.019 ; v1(70.982,97.347) 73.241,99.606 73.241,100.419 v1(73.279,100.457) ; 62.192,51.181 62.192,51.206 62.192,52.019 63.005,52.019 63.583,52.019 ; 62.192,51.181 C12.1 63.177,51.613 63.583,52.019
DTR: Q2.2 R10.2 U3.13 | length 11.7
  Top Layer w0.254: Q2.2 28.26,101.194 28.582,100.872 31.415,100.872 31.563,101.02 31.563,104.052 32.258,104.746 U3.13 ; R10.2 31.42,104.013
GND: BOOT.2 C1.2 C2.2 C3.1 C4.1 C5.1 C6.1 C7.1 C8.2 C9.1 C10.2 C11.2 C12.2 D3.2 D4.2 D5.2 D6.2 D7.2 EN.2 J1.1 J2.10 J2.23 R1.1 R2.2 R4.2 SW1.4 TTL.A1_B12 TTL.B1_A12 TTL.S1 TTL.S2 TTL.S3 TTL.S4 U1.1 U1.40 U1.41 U1.42 U1.43 U1.44 U1.45 U1.46 U1.47 U1.48 U1.49 U2.2 U3.1 U3.15 U4.3 U4.11 U4.15 U4.17 U5.4 U5.6 U6.1 U7.2 | length 416.1
  Top Layer w0.254: TTL.S4 TTL.S2 30.232,121.811 TTL.B1_A12 ; C4.1 31.293,85.926 31.699,86.332 U6.1 32.69,91.034 34.442,91.034 34.671,90.805 ; C9.1 36.045,116.459 J1.1 ; U5.4 U5.6 35.771,47.74 U1.40 45.36,47.74 U1.49 U1.48 ; C5.1 34.671,90.805 ; U3.15 34.798,106.68 v1(34.717,104.775) 34.717,104.221 36.068,102.87 36.068,97.434 34.671,96.037 34.671,90.805 ; U3.1 36.068,116.482 J1.1 ; TTL.A1_B12 36.632,121.26 TTL.S1@37.726,121.26 ; TTL.S3 37.757,124.957 ; R2.2 42.888,122.72 42.888,124.041 v1(42.926,124.079) ; R1.1 42.85,125.172 42.635,124.957 37.757,124.957 ; J2.23 46.33,94.247 D6.2 ; D7.2 50.374,72.783 50.946,73.355 50.946,74.029 ; J2.10 52.83,94.273 52.81,94.253 52.81,93.066 53.746,92.129 53.746,90.006 ; U1.42 U1.43 ; U1.41 U1.48 ; D4.2 52.192,72.783 50.946,74.029 ; SW1.4 SW1.4@53.83,86.454 ; v1(55.43,84.539) 55.364,84.605 55.118,84.605 53.83,85.893 SW1.4@53.83,86.454 ; C6.1 63.156,87.261 64.668,88.773 67.894,88.773 69.85,86.817 69.85,85.036 69.65,84.836 69.482,84.667 68.735,84.667 68.73,84.662 68.162,84.662 v1(68.095,84.596) ; v1(66.108,86.102) 66.202,86.102 66.324,85.979 C7.1 ; v1(66.605,87.412) 67.256,86.761 67.256,86.197 C7.1 ; U7.2 67.229,82.804 68.095,83.67 v1(68.095,84.596) ; C8.2 69.037,61.558 69.758,62.279 EN.2 72.339,62.279 72.542,62.482 72.542,62.509 ; v1(67.793,67.258) 72.542,62.509 ; v1(68.649,118.364) C2.2 70.307,117.221 70.882,116.646 U4.15 70.882,115.414 71.132,115.164 U4.17 ; v1(72.542,81.356) 72.542,81.264 72.772,81.034 72.772,62.279 ; v1(72.542,86.106) 72.772,86.336 C1.2 72.772,96.748 72.221,97.298 ; U4.11 71.954,114.842 71.704,114.592 U4.17 ; BOOT.2 72.772,62.279 ; C3.1 74.305,111.059 73.99,110.744 73.99,99.162 73.762,98.933 R4.2 73.475,98.552 72.221,97.298 ; J1.1 36.601,116.494 36.601,120.135 TTL.S1@37.726,121.26 ; TTL.S1@37.726,121.26 37.757,121.26 TTL.S1 37.757,124.957 ; D6.2 D5.2 53.746,90.006 ; D6.2 50.946,89.631 50.946,74.029 ; U1.48 U1.47 U1.46 U1.45 U1.44 U1.43 ; 53.746,90.006 53.83,89.922 SW1.4@53.83,86.454 ; U1.43 54.48,48.768 55.508,47.74 U1.1 v1(64.077,47.74) 72.784,47.74 73.812,48.768 73.812,51.525 D3.2 73.152,61.899 72.772,62.279 ; C7.1 67.474,85.077 67.888,84.662 68.029,84.662 v1(68.095,84.596) ; U4.17 70.532,114.592 70.282,114.342 U4.3 66.488,114.342 64.932,112.786 64.932,108.728 66.106,107.554 C10.2 65.913,104.836 65.913,100.584 66.167,100.33 U2.2 67.945,100.33 68.504,99.771 68.504,98.247 68.758,97.993 71.526,97.993 72.221,97.298 ; 72.542,62.509 72.772,62.279
  Bottom Layer w0.254: TTL.S4 29.107,125.984 37.726,125.984 39.123,124.587 42.291,124.587 42.469,124.587 42.926,124.13 v1(42.926,124.079) ; v1(34.717,104.775) 34.717,104.821 36.08,106.184 J1.1 37.95,118.364 v1(68.649,118.364) ; v1(55.43,84.539) 55.456,84.564 65.837,84.564 66.108,84.835 v1(66.108,86.102) ; v1(64.077,47.74) 64.077,50.096 ; C12.2 64.077,50.096 ; v1(66.605,87.412) 67.232,86.785 67.232,86.667 67.793,86.106 ; C11.2 64.45,49.723 64.077,50.096 ; v1(67.793,67.258) 67.805,67.271 67.805,69.202 67.818,69.215 67.818,84.225 68.095,84.503 v1(68.095,84.596) ; v1(72.542,81.356) 67.793,86.106 ; v1(72.542,86.106) 67.793,86.106
NetBOOT_1: BOOT.1 Q2.3 R5.1 U1.27 | length 99.4
  Top Layer w0.254: v1(27.94,85.598) 28.006,85.664 28.006,98.085 29.21,99.289 Q2.3 ; v1(42.824,70.714) 42.824,64.25 U1.27 43.282,64.25 46.546,60.985 v1(47.371,60.985) ; v1(64.135,53.975) 62.513,53.975 62.183,53.645 62.183,52.681 62.609,52.255 R5.1 ; v1(74.93,53.975) 75.184,54.229 75.184,57.07 v1(75.145,57.109) ; v1@75.184,57.149 75.145,57.188 75.145,58.84 BOOT.1
  Bottom Layer w0.254: v1(27.94,85.598) v1(42.824,70.714) ; v1(47.371,60.985) 48.701,59.655 72.599,59.655 v1(75.145,57.109) ; v1(64.135,53.975) v1(74.93,53.975)
NetC8_1: C8.1 EN.1 Q1.3 R6.1 U1.3 | length 92.2
  Top Layer w0.254: v1(28.575,83.278) 28.575,96.791 31.495,99.711 Q1.3 ; v1(55.873,63.147) 55.88,63.14 55.88,52.312 57.912,50.28 U1.3 65.105,50.28 R6.1 65.569,50.234 67.564,52.229 C8.1 68.783,60.108 70.012,58.879 EN.1
  Bottom Layer w0.254: v1(28.575,83.278) 48.706,63.147 v1(55.873,63.147)
NetD1_A: D1.A TTL.A4_B9 TTL.B4_A9 | length 62.3
  Top Layer w0.254: TTL.B4_A9 31.032,117.455 30.365,116.788 30.365,112.005 30.255,111.895 ; TTL.A4_B9 35.832,120.541 31.633,116.342 31.633,112.278 31.25,111.895 30.365,111.895 30.255,111.895 ; D1.A 48.59,124.333 45.136,127.787 28.448,127.787 27.991,127.33 27.991,115.849 29.108,114.732 29.108,112.116 29.329,111.895 30.255,111.895
NetD2_A: D2.A J1.2 | length 13.2
  Top Layer w0.254: J1.2 56.846,124.46 D2.A
NetD3_1: D3.1 R7.2 | length 4.8
  Top Layer w0.254: R7.2 71.368,52.469 D3.1
NetD4_1: D4.1 R8.2 | length 6.5
  Top Layer w0.254: D4.1 57.15,78.347 R8.2
NetD5_1: D5.1 R13.2 | length 12
  Top Layer w0.254: v1(51.875,88.527) 51.875,88.621 52.301,89.046 52.301,89.073 52.375,89.147 53.067,89.147 D5.1 ; R13.2 v1(57.15,89.154)
  Bottom Layer w0.254: v1(51.875,88.527) 52.378,89.03 52.378,89.151 57.147,89.151 v1(57.15,89.154)
NetD6_1: D6.1 R9.2 | length 6.3
  Top Layer w0.254: R9.2 46.228,85.483 D6.1
NetD7_1: D7.1 R14.2 | length 6.3
  Top Layer w0.254: R14.2 46.228,77.966 D7.1
NetJ2_3: J2.3 U1.12 | length 42.2
  Top Layer w0.254: J2.3 56.33,98.323 59.512,98.323 60.325,97.511 60.325,65.888 59.309,64.872 59.309,61.939 59.538,61.71 U1.12
NetJ2_4: J2.4 U1.17 | length 36.4
  Top Layer w0.254: J2.4 55.83,93.649 59.203,90.276 59.203,66.853 58.999,66.65 56.228,66.65 56.025,66.446 U1.17
NetJ2_5: J2.5 U1.18 | length 37.2
  Top Layer w0.254: U1.18 54.755,67.557 57.912,70.714 57.912,79.756 56.693,79.756 56.388,80.061 56.388,83.49 57.709,83.49 57.912,83.693 57.912,89.992 55.33,92.574 J2.5
NetJ2_6: J2.6 U1.19 | length 35.5
  Top Layer w0.254: U1.19 53.485,71.367 53.746,71.628 53.746,73.457 52.629,73.457 52.426,73.66 52.426,80.34 56.205,84.12 56.205,89.506 54.83,90.881 J2.6
NetJ2_7: J2.7 U1.20 | length 34.9
  Top Layer w0.254: v1(51.3,72.79) 51.372,72.79 52.215,71.947 U1.20 ; J2.7 54.33,89.806 55.499,88.637 v1(55.499,86.487)
  Bottom Layer w0.254: v1(51.3,72.79) 51.3,82.618 53.37,84.689 53.701,84.689 v1(55.499,86.487)
NetJ2_8: J2.8 U1.21 | length 64.2
  Top Layer w0.254: U1.21 51.041,65.596 v1(51.041,71.742) ; J2.8 v1(53.83,99.162)
  Bottom Layer w0.254: v1(51.041,71.742) 51.091,71.692 56.477,71.692 66.827,82.042 66.827,86.304 66.315,86.817 64.592,86.817 64.033,87.376 64.033,96.317 62.636,97.714 50.724,97.714 50.089,98.349 50.089,99.162 50.622,99.695 53.297,99.695 v1(53.83,99.162)
NetJ2_9: J2.9 U1.11 | length 49.8
  Top Layer w0.254: J2.9 53.33,93.406 v1(53.365,93.37) ; v1(58.631,60.43) 60.32,60.43 U1.11 ; v1(59.766,72.542) v1(59.766,91.288)
  Bottom Layer w0.254: v1(53.365,93.37) 55.448,91.288 v1(59.766,91.288) ; v1(58.631,60.43) 58.631,60.304 58.362,60.036 56.973,60.036 56.537,60.036 56.388,60.185 56.388,61.218 56.537,61.366 57.44,61.366 57.678,61.605 57.861,61.605 59.166,61.605 59.969,62.408 59.969,72.339 v1(59.766,72.542)
NetJ2_11: J2.11 U1.10 | length 49.7
  Top Layer w0.254: v1(52.07,96.012) 52.07,96.106 52.33,96.366 J2.11 ; v1(58.729,62.374) 58.729,62.281 58.024,61.576 58.024,59.512 58.366,59.17 U1.10
  Bottom Layer w0.254: v1(52.07,96.012) 52.07,93.628 52.273,93.425 52.273,91.135 50.368,89.23 50.368,71.526 50.77,71.125 57.214,71.125 59.588,68.75 59.588,63.234 v1(58.729,62.374)
NetJ2_12: J2.12 U1.8 | length 55.4
  Top Layer w0.254: v1(50.368,64.313) 56.769,64.313 57.071,64.011 57.071,61.887 57.624,61.333 57.624,58.136 59.131,56.63 U1.8 ; v1(51.359,91.491) 51.359,96.221 51.83,96.692 J2.12
  Bottom Layer w0.254: v1(50.368,64.313) 43.967,70.714 43.967,84.099 v1(51.359,91.491)
NetJ2_13: J2.13 U1.9 | length 58.9
  Top Layer w0.254: J2.13 51.33,100.327 53.264,102.26 60.909,102.26 61.722,101.448 61.722,58.522 61.1,57.9 U1.9
NetJ2_16: J2.16 U1.7 | length 80
  Top Layer w0.254: J2.16 49.83,98.116 50.643,98.928 v1(50.774,98.928) ; v1(56.991,60.59) 56.991,60.497 56.841,60.346 56.841,57.9 59.348,55.393 60.297,55.393 U1.7
  Bottom Layer w0.254: v1(50.774,98.928) 51.608,98.095 67.477,98.095 73.101,92.47 73.101,64.211 70.114,61.224 57.836,61.224 57.598,60.985 57.48,60.985 57.085,60.59 v1(56.991,60.59)
NetJ2_17: J2.17 U1.13 | length 54.2
  Top Layer w0.254: v1(48.83,96.271) 48.896,96.337 48.998,96.337 49.33,96.669 J2.17 ; U1.13 60.63,62.98 61.334,63.684 61.334,98.338 60.992,98.68 v1(60.992,98.768)
  Bottom Layer w0.254: v1(48.83,96.271) 48.83,98.919 50.394,100.482 59.284,100.482 60.992,98.774 v1(60.992,98.768)
NetJ2_18: J2.18 U1.6 | length 67.5
  Top Layer w0.254: J2.18 48.83,99.229 53.335,103.734 61.773,103.734 62.281,103.226 62.281,55.36 61.011,54.09 U1.6
NetJ2_19: J2.19 U1.15 | length 58.1
  Top Layer w0.254: v1(42.088,68.301) 42.088,97.003 44.272,99.187 47.898,99.187 48.33,98.755 J2.19 ; v1(57.995,63.968) 58.544,64.518 58.544,65.479 U1.15
  Bottom Layer w0.254: v1(42.088,68.301) 47.843,62.545 56.889,62.545 57.929,63.585 57.929,63.902 v1(57.995,63.968)
NetJ2_20: J2.20 U1.5 | length 64.4
  Top Layer w0.254: J2.20 47.83,98.372 47.517,98.685 45.116,98.685 43.866,97.434 43.866,64.491 44.628,63.729 56.418,63.729 56.567,63.58 56.567,61.139 56.316,60.888 56.316,57.476 59.257,54.534 59.257,53.035 U1.5
NetJ2_22: J2.22 U1.4 | length 82.7
  Top Layer w0.254: v1(44.526,70.942) 44.526,97.415 45.415,98.304 46.83,98.304 J2.22 ; v1(57.099,54.508) 57.099,52.972 58.522,51.55 U1.4
  Bottom Layer w0.254: v1(44.526,70.942) 44.856,70.612 57.074,70.612 59.207,68.478 59.207,63.73 57.224,61.747 47.269,61.747 46.736,61.214 46.736,60.604 52.832,54.508 v1(57.099,54.508)
NetJ3_1: J3.1 U4.10 | length 11.7
  Top Layer w0.254: U4.10 74.007,114.342 74.676,115.011 J3.1
NetJ3_2: J3.2 U4.9 | length 18.5
  Top Layer w0.254: J3.2 73.406,125.603 75.54,125.603 75.768,125.374 75.768,114.604 75.006,113.842 U4.9
NetL1_1: L1.1 U2.3 | length 5.1
  Top Layer w0.254: L1.1 65.463,98.193 66.65,99.38 U2.3
NetQ1_1: Q1.1 R10.1 | length 17.1
  Top Layer w0.254: R10.1 29.649,104.376 31.674,106.401 31.674,108.306 32.106,108.737 32.614,108.737 32.842,108.509 32.842,104.572 32.537,104.267 32.537,100.99 33.884,100.99 34.604,101.711 Q1.1
NetQ2_1: Q2.1 R11.1 | length 5
  Top Layer w0.254: R11.1 26.728,103.522 27.761,102.489 29.881,102.489 30.16,102.21 Q2.1
NetR1_2: R1.2 TTL.A5 | length 12.4
  Top Layer w0.254: TTL.A5 34.682,124.776 36.994,127.088 38.202,127.088 39.56,125.73 R1.2
NetR2_1: R2.1 TTL.B5 | length 14.4
  Top Layer w0.254: v1(31.682,119.923) TTL.B5 ; v1(39.167,122.682) R2.1
  Bottom Layer w0.254: v1(31.682,119.923) 31.844,119.761 38.811,119.761 39.167,120.117 v1(39.167,122.682)
NetR3_1: R3.1 R4.1 U2.5 | length 5.9
  Top Layer w0.254: U2.5 70.891,101.28 71.338,101.727 R3.1 R4.1
NetR8_1: R8.1 R13.1 U1.31 | length 38.7
  Top Layer w0.254: U1.31 v1(44.704,59.17) ; R13.1 R8.1 58.115,80.612 58.649,80.079 v1(58.649,67.208)
  Bottom Layer w0.254: v1(44.704,59.17) 44.704,60.503 46.33,62.128 57.066,62.128 57.383,62.445 58.649,63.712 v1(58.649,67.208)
NetR9_1: R9.1 R14.1 U1.22 | length 24.8
  Top Layer w0.254: R14.1 R9.1 48.786,82.862 50.565,81.083 50.565,73.629 49.581,73.629 48.489,72.537 48.489,68.859 49.675,67.673 U1.22
NetR12_2: R12.2 U4.4 | length 5.5
  Top Layer w0.254: R12.2 65.852,112.979 66.715,113.842 U4.4
NetSW1_1: SW1.1 U1.23 | length 21.6
  Top Layer w0.254: U1.23 48.405,66.657 45.212,69.85 45.212,79.428 45.616,79.832 48.339,79.832 49.33,78.842 SW1.1
NetTTL_A6: TTL.A6 TTL.B6 U3.5 | length 12.3
  Top Layer w0.254: U3.5 30.988,116.586 32.651,118.249 ; TTL.B6 32.651,120.396 32.651,118.249 ; TTL.A6 33.682,119.28 32.651,118.249
NetTTL_A7: TTL.A7 TTL.B7 U3.6 | length 31.8
  Top Layer w0.254: U3.6 29.718,117.119 28.372,118.466 28.372,126.797 28.854,127.279 33.147,127.279 ; TTL.A7 33.151,122.072 33.147,127.279 ; TTL.B7 34.182,126.244 33.147,127.279
NetU1_32: U1.32 U4.1 | length 82
  Top Layer w0.254: U1.32 42.064,57.9 41.326,58.639 41.326,106.223 50.8,115.697 69.255,115.697 69.404,115.548 69.404,115.35 69.412,115.342 U4.1
NetU1_33: U1.33 U4.16 | length 85
  Top Layer w0.254: U1.33 41.922,56.63 41.677,57.613 40.843,58.447 40.843,106.502 50.673,116.332 70.352,116.332 U4.16
NetU1_34: U1.34 U4.14 | length 94
  Top Layer w0.254: U1.34 42.189,55.36 41.224,56.325 41.224,57.379 40.462,58.141 40.462,110.566 v1(48.946,119.05) ; U4.14 v1(71.382,119.05)
  Bottom Layer w0.254: v1(48.946,119.05) v1(71.382,119.05)
NetU1_35: U1.35 U5.2 | length 18.9
  Top Layer w0.254: v1(40.615,56.794) 40.615,55.538 42.062,54.09 U1.35
  Bottom Layer w0.254: U5.2 29.083,49.686 36.192,56.794 v1(40.615,56.794)
NetU1_36: U1.36 U3.2 | length 64
  Top Layer w0.254: U3.2 34.798,110.287 39.04,106.045 39.04,57.442 40.23,56.252 40.23,54.614 42.024,52.82 U1.36
NetU1_37: U1.37 U3.3 | length 75.7
  Top Layer w0.254: U3.3 33.528,111.303 32.512,110.287 27.584,110.287 26.213,108.915 26.213,69.661 39.776,56.098 39.776,52.121 40.347,51.55 U1.37
NetU1_38: U1.38 U5.1 | length 27.9
  Top Layer w0.254: v1(41.06,50.978) 41.758,50.28 U1.38
  Bottom Layer w0.254: U5.1 27.965,57.23 27.965,48.346 28.134,48.177 28.35,47.962 28.583,47.962 28.59,47.955 29.667,47.955 30.361,48.649 30.361,50.046 31.293,50.978 v1(41.06,50.978)
NetU1_39: U1.39 U5.3 | length 19.1
  Top Layer w0.254: U5.3 33.346,60.071 35.154,60.071 39.384,55.84 39.384,51.485 41.859,49.01 U1.39
RTS: Q1.2 R11.2 U3.14 | length 17.7
  Top Layer w0.254: R11.2 28.245,104.013 29.083,104.851 29.083,108.407 30.074,109.398 33.045,109.398 33.528,108.915 U3.14 33.528,104.76 33.213,104.445 Q1.2
Vcc: C2.1 C3.2 C10.1 D1.C D2.C U2.1 U2.4 U4.7 U4.8 | length 79.9
  Top Layer w0.4: D1.C 55.272,124.333 57.558,126.619 61.367,126.619 63.145,124.841 D2.C@63.145,124.587 ; D2.C 63.272,124.587 68.776,124.587 ; U2.1 68.296,101.275 ; C2.1 67.749,123.539 67.866,123.656 67.877,123.667 68.65,124.333 68.762,124.445 68.776,124.587 ; C10.1 71.382,105.029 ; U2.4 69.384,99.38 69.304,99.459 69.304,100.266 68.296,101.275 ; C3.2 75.657,109.632 76.21,109.632 76.454,109.876 76.454,111.989 ; 68.296,101.275 71.382,104.361 71.382,105.029 ; 68.776,124.587 68.834,124.645 68.834,127.127 69.718,128.011 75.971,128.011 76.089,127.893 76.454,127.528 76.454,111.989 ; 71.382,105.029 U4.7 U4.8 75.286,113.157 76.454,111.989
pads on no net: J1.MH1 J1.MH2 J2.1 J2.2 J2.24 J2.P1 J2.P2 J3. SW1.2 SW1.3 TTL. TTL.A8 TTL.B8 U1.14 U1.16 U1.24 U1.25 U1.26 U1.28 U1.29 U1.30 U3.7 U3.8 U3.9 U3.10 U3.11 U3.12 U4.2 U4.5 U4.6 U4.12 U4.13 U5.0 U7.4

## Text inside footprints (layer, text, board x,y; h text height)
TTL: Top Assembly "PCB EDGE" at 28.232,127.881 h0.61 r180